# Altium PCB CW341_KintexUSTarget.PcbDoc (part 2 of 7)
Units mil, origin at the board's own origin, x right, y up, seen from the top; angles counter-clockwise.
Board outline 4566.97 x 5485 mil, 6 copper layers (Top Layer, Layer 2 (GND), Layer 3 (sig), Layer 4 (sig), Layer 5 (PWR), Bottom Layer), stack 61.068 mil thick; 157 components, 262 nets, 1869 pads, 1478 vias.
Unrouted connection lines stored in the file: 128.
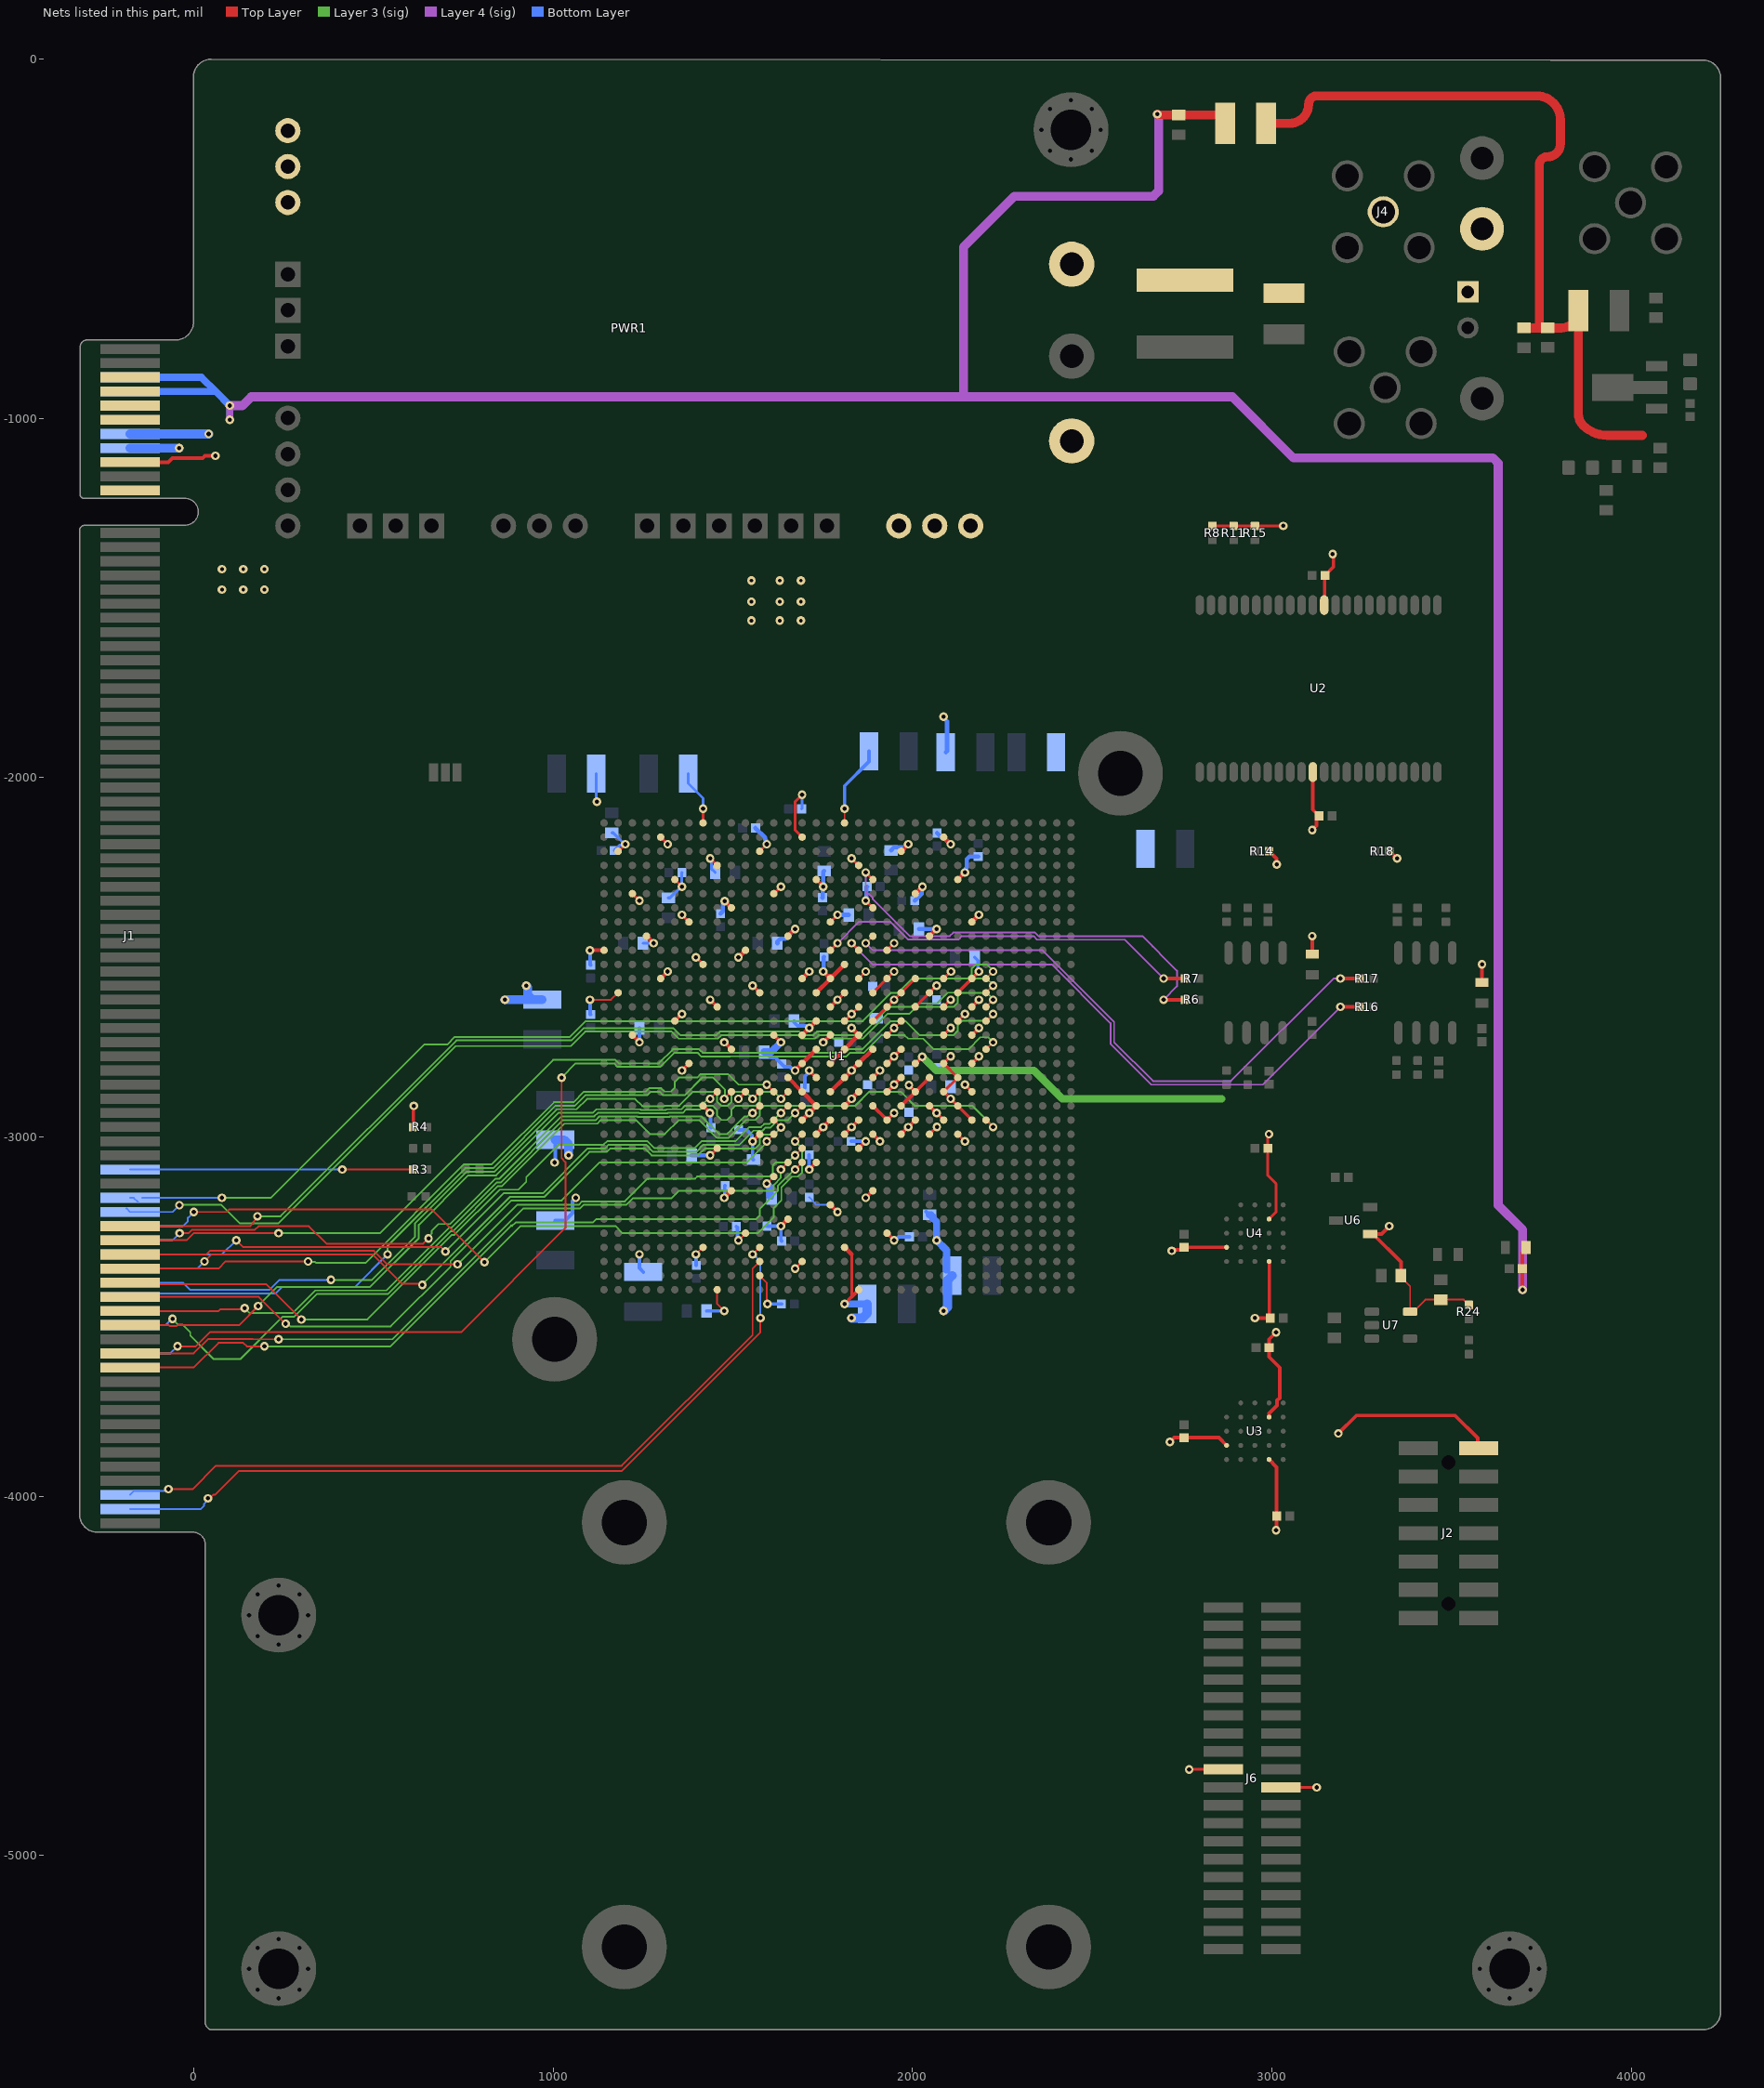
[diagram p6: the nets of this part, all layers, seen from the top]

## Part data
C1 C2 C3 C4 C7 C8 C9 C10 C11 C13 C18 C19 C24 C27 C28 C29 C30 C33 C35 C36 C39 C40 C41 C44 C45 C46 C48 C49 C50 C51 C52 C54 C56 C57 C59 C62 C63 C64 C67 C68 C69 C71 C73 C79 C81 C82 C89: library part CCHIP-100n-0402, "100n, 0402", Case-EIA=0402, Manufacture Part Number 1=CGA2B3X7R1V104K050BB, Supplier Part Number 1=445-6901-1-ND, Component Group=Capacitor, Component Type=Standard, Mounting Technology=SMT, Part Number=CCHIP-100n-0402, Pin Count=2, Supplier 1=Digi-Key
C5 C6 C15 C17: library part CCHIP-18p-0402, "18p, 0402", Case-EIA=0402, Manufacture Part Number 1=GRM1555C1H180JA01D, Supplier Part Number 1=490-5858-1-ND, Component Group=Capacitor, Component Type=Standard, Mounting Technology=SMT, Part Number=CCHIP-18p-0402, Pin Count=2, Supplier 1=Digi-Key
C12: library part CCHIP-1u-0603, "1u, 0603, 50V", Case-EIA=0603, Case-Metric=1608, Manufacture Part Number 1=CL10A105KB8NNNC, Rated Voltage=50VDC, Supplier Part Number 1=1276-1860-1-ND, Component Group=Capacitor, Component Type=Standard, Mounting Technology=SMT, Part Number=CCHIP-1u-0603, Pin Count=2, Supplier 1=Digi-Key
C14: library part CCHIP-2u2-0603-25V, "2u2, 0603", Case-EIA=0603, Case-Metric=1608, Manufacture 1="Murata Electronics North America", Manufacture Part Number 1=GRM188R61E225MA12D, Rated Voltage=25VDC, Supplier Part Number 1=490-12738-1-ND, Tolerance=±20%, Component Group=Capacitor, Component Type=Standard, Mounting Technology=SMT, Part Number=CCHIP-2u2-0603-25V, Pin Count=2, RoHS=Yes, Supplier 1=Digi-Key
C16: library part CCHIP-470n-0603-50V, "470n, 0603, 50V", Case-EIA=0603, Manufacture 1="Taiyo Yuden", Manufacture Part Number 1=UMK107B7474KA-TR, Rated Voltage=50VDC, Supplier Part Number 1=587-3170-1-ND, Temperature Range="-55C to 125C", Component Group=Capacitor, Component Type=Standard, Mounting Technology=SMT, Part Number=CCHIP-470n-0603-50V, Pin Count=2, RoHS=Yes, Supplier 1=Digi-Key
C20 C21 C22 C23 C32 C34 C72 C75 C80 C83 C84 C85: library part CCHIP-47u-1210, "47u, 10V, 1210, Ceramic", Case-EIA=1210, Case-Metric=3225, Manufacture 1="TDK Corporation", Manufacture Part Number 1=C3225X5R1A476M250AC, Rated Voltage=10VDC, Supplier Part Number 1=445-6711-1-ND, Temperature Range="-55C to 85C", Tolerance=20%, Component Group=Capacitor, Component Type=Standard, Mounting Technology=SMT, Part Number=CCHIP-47u-1210, Pin Count=2, Supplier 1=Digi-Key
C25 C26 C31 C37 C38 C42 C43 C47 C53 C55 C58 C60 C61 C65 C66 C70 C74 C76 C77 C78 C90 C91: library part CCHIP-2u2-0603, "2u2, 0603", Case-EIA=0603, Case-Metric=1608, Manufacture 1=Samsung, Manufacture Part Number 1=CL10B225KP8NNNC, Rated Voltage=10VDC, Supplier Part Number 1=1276-1134-1-ND, Component Group=Capacitor, Component Type=Standard, Mounting Technology=SMT, Part Number=CCHIP-2u2-0603, Pin Count=2, Supplier 1=Digi-Key
C86 C88: library part CCHIP-10u-0603, "10u, 0603", Case-EIA=0603, Case-Metric=1608, Manufacture Part Number 1=GRM188R61C106MA73D, Supplier Part Number 1=490-7201-1-ND, Component Group=Capacitor, Component Type=Standard, Mounting Technology=SMT, Part Number=CCHIP-10u-0603, Pin Count=2, Supplier 1=Digi-Key
C87: library part CCHIP-1n-0603, "1n, 0603", Case-EIA=0603, Case-Metric=1608, Manufacture 1=AVX, Manufacture Part Number 1=06033D102KAT2A, Rated Voltage=50VDC, Component Group=Capacitor, Component Type=Standard, Mounting Technology=SMT, Part Number=CCHIP-1n-0603, Pin Count=2, Supplier 1=Digi-Key
C94: library part CCHIP-DNM-0603, "DNM, 0603", Case-EIA=0603, Component Group=Capacitor, Component Type=Standard, Mounting Technology=SMT, Part Number=CCHIP-DNM-0603, Pin Count=2
FAN1: library part BFB03505HHA-A, Manufacture 1="Delta Fans", Component Group=Mechanical, Component Type=Standard, Manufacture Part Number 1=BFB03505HHA-A, Part Number=BFB03505HHA-A, PP Material Stack=0, PP Rotation=0, PP Rotation1=0
HS1: "Heatsink, 35mm square", Manufacture 1=ATS, Component Group=Mechanical, Component Type=Standard, Manufacture Part Number 1=ATS-FPX035035015-56-C2-R0, Part Number=ATS-FPX035035015-56-C2-R0, PP Material Stack=0, PP Rotation=0, PP Rotation1=0, Supplier 1=Digi-Key
J1: library part "PCIe x16 Connector Edge (gold finger, x8 mode)", "Edge Fingers No Part to Install", Package=PCIeX16-GF-2D-1000-1K-O164, MF=NA, MP=PCIE-164-02-X-D-RA, Price=NA
J2: "Molex 14-pin SMD, JTAG Pinout", Manufacture 1=Molex, Manufacture 1 Part Number=87832-1420, Supplier Part Number 1=WM18641-ND, Supplier 1=Digi-Key
J3 J4 J7: "SMA, Vert", Manufacture 1="TE Connectivity", Supplier Part Number 1=A97594-ND, Component Group=Connector, Component Type=Standard, Manufacture Part Number 1=5-1814832-1, Part Number=5-1814832-1, Pin Count=2, Supplier 1=Digi-Key
J5: "Header, 2-Pin", LatestRevisionDate=17-Jul-2002, LatestRevisionNote="Re-released for DXP Platform.", Publisher="Altium Limited"
J6: library part CONN_40POS_1.27MM_SHROUDED, Manufacture 1=Samtec, Manufacture Part Number 1=SHF-120-01-L-D-SM, Supplier Part Number 1=SAM9922-ND, Component Group=Connector, Component Type=Standard, Part Number=CONN_40POS_1.27MM_SHROUDED, Pin Count=40, PP Material Stack=0, PP Rotation=0, PP Rotation1=0, Supplier 1=Digi-Key
L1: library part XAL7070-122MEB, "1.2uH, 21A RMS", Manufacture 1=Coilcraft, Component Group=Inductor, Component Type=Standard, Manufacture Part Number 1=XAL7070-122MEB, Part Number=XAL7070-122MEB, Pin Count=2, PP Material Stack=0, PP Rotation=0, PP Rotation1=0, Supplier 1=Mouser
L2: library part FBCHIP-1K-1210, "Ferrite Bead, 1K@100MHz, 2A, 1210, 100mOhm DC, AEC-Q200", Case-EIA=1210, Case-Metric=3225, Manufacture 1="Taiyo Yuden", Supplier Part Number 1=587-3835-1-ND, Temperature Range="-40C to 125C", Component Group=Inductor, Component Type=Standard, Manufacture Part Number 1=FBMH3225HM102NTV, Mounting Technology=SMT, Part Number=FBCHIP-1K-1210, Pin Count=2, PP Material Stack=0, PP Rotation=0, RoHS=Yes, Supplier 1=Digi-Key
L3 L5: library part FBCHIP-120R-0603, "120 Ohm @ 100 MHz, 3A rated FB", Case-EIA=0603, Case-Metric=1680, Manufacture 1="Murata Electronics", Manufacture Part Number 1=BLM18SG121TN1D, Rated Power=3A, Supplier Part Number 1=490-3996-1-ND, Component Group=Inductor, Component Type=Standard, Part Number=FBCHIP-120R-0603, Pin Count=2, PP Material Stack=0, PP Rotation=0, Supplier 1=Digi-Key
L4 L6: library part FBCHIP-600R-0603, "600 Ohm @ 100 MHz, 0.5A rated FB", Case-EIA=0603, Case-Metric=1608, Manufacture 1="Murata Electronics", Manufacture Part Number 1=BLM18AG601SN1D, Rated Power=0.5A, Supplier Part Number 1=490-1014-2-ND, Component Group=Inductor, Component Type=Standard, Part Number=FBCHIP-600R-0603, Pin Count=2, PP Material Stack=0, PP Rotation=0, Supplier 1=Digi-Key
L7: library part FBCHIP-1K-1210, "Ferrite Bead, 1K@100MHz, 2A, 1210, 100mOhm DC, AEC-Q200", Case-EIA=1210, Case-Metric=3225, Manufacture 1="Taiyo Yuden", Manufacture Part Number 1=FBMH3225HM102NTV, Supplier Part Number 1=587-3835-1-ND, Temperature Range="-40C to 125C", Component Group=Inductor, Component Type=Standard, Mounting Technology=SMT, Part Number=FBCHIP-1K-1210, Pin Count=2, PP Material Stack=0, PP Rotation=0, RoHS=Yes, Supplier 1=Digi-Key
L8: "15uH, 300mA, 1210 Inductor", Case-EIA=1210, Case-Metric=3225, Manufacture 1="Murata Electronics", Supplier Part Number 1=490-9909-1-ND, Temperature Range="-40C to 125C", Component Group=Inductor, Component Type=Standard, Manufacture Part Number 1=LQH32DN150K53L, Mounting Technology=SMT, Part Number=LQH32DN150K53L, Pin Count=2, PP Material Stack=0, PP Rotation=0, RoHS=Yes, Supplier 1=Digi-Key
L9: library part LCHIP-5N1-0603, "FIXED IND 5.1nH", Case-EIA=0603, Case-Metric=1608, Manufacture 1=Coilcraft, Manufacture Part Number 1=0603CS-5N1XJLU, Supplier Part Number 1=994-0603CS-5N1XJLU, Tolerance=±5%, Component Group=Inductor, Component Type=Standard, Mounting Technology=SMT, Part Number=LCHIP-5N1-0603, Pin Count=2, PP Material Stack=0, PP Rotation=0, Supplier 1=Mouser
MH1 MH2 MH4 MH6: library part MOUNT_#4_TIGHT, "Machine screw 4-40 Mounting Hole", Component Group=Mechanical, Component Type=Mechanical, Part Number=MOUNT_#4_TIGHT, Pin Count=1, PP Material Stack=0, PP Rotation=0
R1 R5 R6 R7 R16 R17 R23: library part RCHIP-1K-0402, "1k res, 0402, 1%, 1/16W", Case-EIA=0402, Case-Metric=1005, Manufacture 1=Yageo, Manufacture Part Number 1=RC0402FR-071KL, Rated Power=0.063W, Rated Voltage=75VDC, Supplier Part Number 1=311-1.00KLRCT-ND, Temperature Range="-55C to 155C", Tolerance=1%, Component Group=Resistor, Component Type=Standard, Mounting Technology=SMT, Part Number=RCHIP-1K-0402, Pin Count=2, Supplier 1=Digi-Key
R2 R4: library part RCHIP-DNM-0402, Case-EIA=0402, Case-Metric=1005, Component Group=Resistor, Component Type=Standard, Part Number=RCHIP-DNM-0402, Pin Count=2
R3: library part RCHIP-1R0-0402, "1R0 res, 0402, 1%, 1/16W", Case-EIA=0402, Case-Metric=1005, Manufacture 1=Yageo, Manufacture Part Number 1=RC0402FR-071RL, Rated Power=0.063W, Rated Voltage=75VDC, Supplier Part Number 1=311-1.00LRCT-ND, Temperature Range="-55C to 155C", Tolerance=1%, Component Group=Resistor, Component Type=Standard, Mounting Technology=SMT, Part Number=RCHIP-1R0-0402, Pin Count=2, Supplier 1=Digi-Key
R8 R11 R14 R15 R18: library part RCHIP-10K-0402, "10k res, 0402, 1%, 1/16W", Case-EIA=0402, Case-Metric=1005, Manufacture 1=Yageo, Manufacture Part Number 1=RC0402FR-0710KL, Rated Power=0.063W, Rated Voltage=75VDC, Supplier Part Number 1=311-10.0KLRCT-ND, Temperature Range="-55C to 155C", Tolerance=1%, Component Group=Resistor, Component Type=Standard, Mounting Technology=SMT, Part Number=RCHIP-10K-0402, Pin Count=2, Supplier 1=Digi-Key
R9 R12 R20 R21: library part RCHIP-220K-0402, "220k res, 0402, 1%, 1/16W", Case-EIA=0402, Case-Metric=1005, Manufacture 1=Yageo, Manufacture Part Number 1=RC0402FR-07220KL, Rated Power=0.063W, Rated Voltage=75VDC, Supplier Part Number 1=311-220KLRCT-ND, Temperature Range="-55C to 155C", Tolerance=1%, Component Group=Resistor, Component Type=Standard, Mounting Technology=SMT, Part Number=RCHIP-220K-0402, Pin Count=2, Supplier 1=Digi-Key
R10 R13 R19 R22: library part RCHIP-680K-0402, "680k res, 0402, 1%, 1/16W", Case-EIA=0402, Case-Metric=1005, Manufacture 1=Yageo, Manufacture Part Number 1=RC0402FR-07680KL, Rated Power=0.063W, Rated Voltage=75VDC, Supplier Part Number 1=YAG3211CT-ND, Temperature Range="-55C to 155C", Tolerance=1%, Component Group=Resistor, Component Type=Standard, Mounting Technology=SMT, Part Number=RCHIP-680K-0402, Pin Count=2, Supplier 1=Digi-Key
R24: library part RCHIP-2K7-0402, "2k7 res, 0402, 1%, 1/16W", Case-EIA=0402, Case-Metric=1005, Manufacture 1=Yageo, Manufacture Part Number 1=RC0402FR-072K7L, Rated Power=0.063W, Rated Voltage=75VDC, Supplier Part Number 1=311-2.70KLRCT-ND, Temperature Range="-55C to 155C", Tolerance=1%, Component Group=Resistor, Component Type=Standard, Mounting Technology=SMT, Part Number=RCHIP-2K7-0402, Pin Count=2, Supplier 1=Digi-Key
R25: library part RCHIP-1K5-0603, "1k5 res, 0603, 1%, 1/10W", Case-EIA=0603, Case-Metric=1608, Manufacture 1=Yageo, Manufacture Part Number 1=RC0603FR-071K5L, Rated Power=0.1W, Rated Voltage=75VDC, Supplier Part Number 1=311-1.50KHRCT-ND, Temperature Range="-55C to 155C", Tolerance=1%, Component Group=Resistor, Component Type=Standard, Mounting Technology=SMT, Part Number=RCHIP-1K5-0603, Pin Count=2, Supplier 1=Digi-Key
R26: library part RCHIP-51R-0603, "51R res, 0603, 1%, 1/10W", Case-EIA=0603, Case-Metric=1608, Manufacture 1=Yageo, Manufacture Part Number 1=RC0603FR-0751RL, Rated Power=0.1W, Rated Voltage=75VDC, Supplier Part Number 1=311-51.0HRCT-ND, Temperature Range="-55C to 155C", Tolerance=1%, Component Group=Resistor, Component Type=Standard, Mounting Technology=SMT, Part Number=RCHIP-51R-0603, Pin Count=2, Supplier 1=Digi-Key
SJ1: library part SJ_3S_12JMP, "Solder Jumper, NC", Component Group="PCB Feature", Component Type="Standard (No BOM)", Mounting Technology=COPPER, Part Number=SJ_3S_12JMP, Pin Count=3
TP1 TP2 TP3: library part TESTPAD_9022-0-00-15-00-00-33-0, Manufacture 1="Mill-Max Manufacturing Corp.", Manufacture Part Number 1=9022-0-00-15-00-00-33-0, Supplier Part Number 1=ED90411-ND, Component Group="Test Point", Component Type=Standard, Mounting Technology=Through-hole, Part Number=TESTPAD_9022-0-00-15-00-00-33-0, Pin Count=1, Supplier 1=Digi-Key
TP4: library part KEYSTONE_5011, "TEST POINT PC MULTI PURPOSE BLK", Supplier Part Number 1=36-5011-ND, Component Group="Test Point", Component Type=Standard, Mounting Technology=Through-hole, Part Number=KEYSTONE_5011, Pin Count=1, Supplier 1=Digi-Key
TP5 TP6: library part KEYSTONE_5008, "TEST POINT PC COMPACT .063\"D ORG", Supplier Part Number 1=36-5008-ND, Component Group="Test Point", Component Type=Standard, Mounting Technology=Through-hole, Part Number=KEYSTONE_5008, Pin Count=1, Supplier 1=Digi-Key
U1: library part IC-XCKU095-1156, "IC FPGA 520 I/O 1156FCBGA", Manufacturer=Xilinx, Manufacturer Part Number=XCKU060-3FFVA1156E, Max Junction Temp=+100°C, Max Supply Voltage=1.8V, Min Supply Voltage=0.97V, Package=0, Temperature="0°C to +100°C", Temperature Range Low=0°C, Automotive=No, Category=IC, ComponentLink2Description=Datasheet, ComponentLink2URL=https://www.xilinx.com/support/documentation/data_sheets/ds890-ultrascale-overview.pdf, Device Class L1="Integrated Circuits (ICs)", Device Class L2="Embedded Processors and Controllers", Device Class L3="FPGAs - Field Programmable Gate Arrays", Digikey Description="IC FPGA 520 I/O 1156FCBGA", Footprint Url=https://www.xilinx.com/support/documentation/user_guides/ug575-ultrascale-pkg-pinout.pdf, Height=3.51mm, Ipc Land Pattern Name=BGA1156N100P34X34_3500X3500X342, Lead Free=Yes, Memory Type=RAM, Number of I/Os=520, Number Of Logic Elements Cells=1176000, Octopart=https://octopart.com/xcku035-3ffva1156e-xilinx-67038192?r=sp, Ram Size=38MBytes, RoHS=TRUE, Speed Grade=3, Standoff Height=0.4mm, Temperature Range High=+100°C
U2: library part IS62WV51216EALL-55TLI, "IC SRAM 8M PARALLEL 44TSOP II", Case/Package=TSOP, Manufacture 1="Alliance Memory", Max Operating Temperature=85°C, Max Supply Current=60mA, Max Supply Voltage=2.2V, Min Operating Temperature=-40°C, Min Supply Voltage=1.65V, Operating Supply Voltage=3V, Package Quantity=135, Supplier Part Number 1=1450-1039-ND, Access Time=55ns, Address Bus Width=20b, Category=RAM, Component Group="Digital IC", Component Type=Standard, ComponentLink3Description=https://datasheet.ciiva.com/9274/as6c8008-9274921.pdf?src-supplier=Avnet, ComponentLink3URL=https://datasheet.ciiva.com/9274/as6c8008-9274921.pdf?src-supplier=Avnet, ComponentLink4Description=https://datasheet.ciiva.com/1510/32786-1510631.pdf?src-supplier=Element14, ComponentLink4URL=https://datasheet.ciiva.com/1510/32786-1510631.pdf?src-supplier=Element14, Density=8Mb, Height=1mm, Interface=Parallel, Lead Free="Lead Free", Length=18.42mm, Manufacture Part Number 1=IS62WV51216EALL-55TLI, Manufacturer Part Number=IS62WV51216EALL-55TLI, Memory Size=8Mb, Memory Type="RAM,SRAM - Asynchronous,SDR", Mount="Surface Mount", Mounting Technology=SMT, Number of Pins=44, Number of Ports=1, Packaging=Tray, Part Number=IS62WV51216EALL-55TLI, Pin Count=44, PP Material Stack=0, PP Rotation=0, Pricing 1="1=6.76000, 10=6.21600, 25=6.08640, 50=6.06560, 135=5.44252, 270=5.27800, 540=5.01900, 1080=4.84400, 5130=4.35750 (USD)", Radiation Hardening=No, REACH SVHC="No SVHC", RoHS=Yes, Stock 1=1798, Supplier 1=Digi-Key, Width=10.16mm
U3 U4: library part S80KS5122GABHM020, "IC PSRAM 512MBIT HYPERBUS 24FBGA", Case/Package=24-VBGA, Manufacture 1="Infineon Technologies", Max Operating Temperature=125°C, Max Supply Current=44mA, Max Supply Voltage=2.5V, Min Operating Temperature=-40°C, Min Supply Voltage=0V, Operating Supply Voltage=1.7V~2V, Package Quantity=0, Supplier Part Number 1=1450-1039-ND, Access Time=35ns, Address Bus Width=8b, Category=RAM, Component Group="Digital IC", Component Type=Standard, ComponentLink3Description=https://datasheet.ciiva.com/9274/as6c8008-9274921.pdf?src-supplier=Avnet, ComponentLink3URL=https://www.infineon.com/dgdl/Infineon-S80KS5122_1.8_V_512-Mbit_HyperBus_Interface_HyperRAM_(Self-Refresh_DRAM)-DataSheet-v01_00-EN.pdf?fileId=8ac78c8c7dc4255f017dd81b77c1088f, ComponentLink4Description=https://datasheet.ciiva.com/1510/32786-1510631.pdf?src-supplier=Element14, ComponentLink4URL=https://www.infineon.com/dgdl/Infineon-S80KS5122_1.8_V_512-Mbit_HyperBus_Interface_HyperRAM_(Self-Refresh_DRAM)-DataSheet-v01_00-EN.pdf?fileId=8ac78c8c7dc4255f017dd81b77c1088f, Density=512Mbit, Height=1mm, Interface=HyperBus, Lead Free="Lead Free", Length=8mm, Manufacture Part Number 1=S80KS5122GABHM020, Manufacturer Part Number=S80KS5122GABHM020, Memory Size=512Mb, Memory Type="RAM,SRAM - Asynchronous,SDR", Mount="Surface Mount", Mounting Technology=SMT, Number of Pins=24, Number of Ports=1, Packaging=Tray, Part Number=S80KS5122GABHM020, Pin Count=24, PP Material Stack=0, PP Rotation=0, Pricing 1="1=6.76000, 10=6.21600, 25=6.08640, 50=6.06560, 135=5.44252, 270=5.27800, 540=5.01900, 1080=4.84400, 5130=4.35750 (USD)", Radiation Hardening=No, REACH SVHC="No SVHC", RoHS=Yes, Stock 1=1798, Supplier 1=Digi-Key, Width=6mm
U5 U8: library part LM2904_SOIC8, "IC OP-AMP GP", Manufacture 1="Texas Instruments", Supplier Part Number 1=296-48991-1-ND, Component Group="Analog IC", Component Type=Standard, Manufacture Part Number 1=TLV8542DR, Mounting Technology=SMT, Part Number=LM2904_SOIC8, Pin Count=8, PP Material Stack=0, PP Rotation=0, RoHS=Yes, Supplier 1=Digi-Key
U6: "IC VREF SERIES 0.2% SOT23-3", Case/Package=SOT-23, Manufacture 1="Texas Instruments", Max Input Voltage=5.5V, Max Operating Temperature=125°C, Max Output Current=25mA, Max Output Voltage=1.25V, Max Supply Current=50uA, Min Input Voltage=1.8V, Min Operating Temperature=-40°C, Min Output Voltage=1.248V, Nominal Supply Current=42uA, Package Quantity=1, Supplier Part Number 1=REF3012AIDBZTTR-ND, Temperature Coefficient=50ppm/°C, Category="Voltage References", Component Group="Analog IC", Component Type=Standard, ComponentLink3Description=https://datasheet.ciiva.com/2007/ref3012-2007154.pdf?src-supplier=Digi-Key, ComponentLink3URL=https://datasheet.ciiva.com/2007/ref3012-2007154.pdf?src-supplier=Digi-Key, ComponentLink4Description=https://datasheet.ciiva.com/2007/ref3012-2007155.pdf?src-supplier=Digi-Key, ComponentLink4URL=https://datasheet.ciiva.com/2007/ref3012-2007155.pdf?src-supplier=Digi-Key, ComponentLink5Description=https://datasheet.ciiva.com/3235/ref3033-3235533.pdf?src-supplier=Avnet, ComponentLink5URL=https://datasheet.ciiva.com/3235/ref3033-3235533.pdf?src-supplier=Avnet, ComponentLink6Description=https://datasheet.ciiva.com/3235/ref3033-3235534.pdf?src-supplier=Avnet, ComponentLink6URL=https://datasheet.ciiva.com/3235/ref3033-3235534.pdf?src-supplier=Avnet, Height=1mm, Lead Free="Lead Free", Length=2.92mm, Manufacture Part Number 1=REF3012AIDBZT, Manufacturer Part Number=REF3012AIDBZT, Mounting Technology=SMT, Number of Channels=1, Number of Pins=3, Output Current=25mA, Output Voltage=1.25V, Packaging="Tape and Reel", Part Number=REF3012AIDBZT, Pin Count=3, PP Material Stack=0, PP Rotation=0, Pricing 1="1=1.18000, 10=1.05300, 25=0.99960, 100=0.76760 (USD)", Quiescent Current=50uA, Radiation Hardening=No, REACH SVHC="No SVHC", Reference Type=Series,Fixed, Reference Voltage=1.25V, RoHS=Yes, Stock 1=7831, Supplier 1=Digi-Key, Termination=SMD/SMT, Width=1.3mm
U7: library part ADP123AUJZ-R7, "IC REG LIN POS ADJ 300MA TSOT5", Case/Package=TSOT, Dropout Voltage=85mV, Manufacture 1="Analog Devices Inc.", Max Input Voltage=5.5V, Max Operating Temperature=125°C, Max Output Current=300mA, Max Output Voltage=5V, Max Supply Current=170uA, Min Current Limit=350mA, Min Input Voltage=2.3V, Min Operating Temperature=-40°C, Min Output Voltage=800mV, Nominal Supply Current=45uA, Output Voltage Accuracy=1%, Power Supply Rejection Ratio (PSRR)=60dB, Reference Voltage=500mV, Supplier Part Number 1=ADP123AUJZ-R7TR-ND, Accuracy=1%, Category="Voltage Regulators - Linear", Component Group="Analog IC", Component Type=Standard, ComponentLink3Description=https://datasheet.ciiva.com/2040/adp122-123-2040698.pdf?src-supplier=Digi-Key, ComponentLink3URL=https://datasheet.ciiva.com/2040/adp122-123-2040698.pdf?src-supplier=Digi-Key, ComponentLink4Description=https://datasheet.ciiva.com/2040/adp122-123-2040699.pdf?src-supplier=Digi-Key, ComponentLink4URL=https://datasheet.ciiva.com/2040/adp122-123-2040699.pdf?src-supplier=Digi-Key, Contact Plating=Tin,Matte, Height=0.9mm, Lead Free="Contains Lead", Length=2.9mm, Manufacture Part Number 1=ADP123AUJZ-R7, Manufacturer Part Number=ADP123AUJZ-R7, Mounting Technology=SMT, Number Of Outputs=1, Number of Pins=5, Number of Regulators=1, Operating Supply Current=45uA, Output Current=300mA, Output Type=Adjustable, Output Voltage=5V, Packaging="Tape and Reel", Part Number=ADP123AUJZ-R7, Pin Count=5, Polarity=Positive, PP Material Stack=0, PP Rotation=0, Pricing 1="1=1.16000, 10=1.03300, 25=0.98000, 100=0.75250, 250=0.66500, 500=0.63000, 1000=0.49000 (USD)", Quiescent Current=45uA, REACH SVHC="No SVHC", Stock 1=14167, Supplier 1=Digi-Key, Width=1.6mm
U9: "Integrated Circuit", Manufacturer_Name=Mini-Circuits, Mouser Part Number=139-PHA-13LN, Datasheet Link=https://www.minicircuits.com/pdfs/PHA-13LN+.pdf, Height=1.6mm, Manufacturer_Part_Number=PHA-13LN+, Mouser Price/Stock=https://www.mouser.co.uk/ProductDetail/Mini-Circuits/PHA-13LN%2b?qs=xZ%2FP%252Ba9zWqYkwnUBoTp7PQ%3D%3D

## Via types
v1: diameter 24, hole 12, Top Layer to Bottom Layer, tented both sides, 1463 vias
v2: diameter 24, hole 10, Top Layer to Bottom Layer, tented both sides, 15 vias

## Nets (pads, with @x,y where several pads share a name; then routed paths per layer and width w, separated by ;. In a path a pad name is that pad's centre, name@x,y a point inside that pad or via, vN(x,y) a via of type N, cw(c..) or ccw(c..) an arc to the next point about the centre after c; other vN are vias at no path point)
1V2: J1.B9 | length 245
  Top Layer w10: J1.B9@-177.17,-1122.05 -70.71,-1122.05 -58.92,-1110.26 25.31,-1110.26 31.54,-1104.02 v1(60.35,-1104.02)
+1V0_VCCINT: C20.1 C21.1 C26.1 C29.1 C35.1 C36.1 C39.1 C40.1 C42.1 C44.1 TP1.1 U1.AA10 U1.AA12 U1.AA14 U1.AA16 U1.AA18 U1.AB11 U1.AB13 U1.AB15 U1.AB17 U1.AC10 U1.AC12 U1.AC14 U1.AC16 U1.M9 U1.M11 U1.M13 U1.M15 U1.M17 U1.N8 U1.N10 U1.N12 U1.N14 U1.N16 U1.P9 U1.P11 U1.P13 U1.P15 U1.P17 U1.R8 U1.R10 U1.R12 U1.R14 U1.R16 U1.R18 U1.T9 U1.T11 U1.T13 U1.T15 U1.T17 U1.U10 U1.U14 U1.U16 U1.U18 U1.V13 U1.V15 U1.V17 U1.W10 U1.W14 U1.W16 U1.W18 U1.Y13 U1.Y15 U1.Y17 | length 1893.8
  Top Layer w5: v1(1948.82,-2696.85) U1.Y13@1968.5,-2677.17
  Top Layer w8: U1.Y17@1811.02,-2677.17 U1.AA16@1850.39,-2637.8 ; U1.AC16@1850.39,-2559.06 v1(1870.08,-2539.37) ; U1.Y15@1889.76,-2677.17 U1.AC12@2007.87,-2559.06 ; U1.AB15@1889.76,-2598.43 U1.AC14@1929.13,-2559.06 v1(1948.82,-2539.37) ; U1.W14@1929.13,-2716.54 v1(1948.82,-2696.85) ; U1.AA12@2007.87,-2637.8 U1.AB11@2047.24,-2598.43 v1(2066.93,-2578.74) ; U1.M11@2047.24,-2992.13 2049.33,-2992.13 2049.33,-2990.36 v1(2068.01,-2971.67) ; U1.W10@2086.61,-2716.54 v1(2106.3,-2696.85) ; U1.AA10@2086.61,-2637.8 v1(2106.3,-2618.11) ; U1.AC10@2086.61,-2559.06 2086.9,-2559.06 2106.59,-2539.37 v1(2106.88,-2539.37) ; v1(2106.3,-2775.59) U1.U10@2086.61,-2795.28 U1.T9@2125.98,-2834.65 U1.R10@2086.61,-2874.02 U1.N8@2165.35,-2952.76 ; U1.M9@2125.98,-2992.13 v1(2145.67,-3011.81) ; v1(2145.67,-2854.33) U1.R8@2165.35,-2874.02
  Top Layer w10: v1(1751.97,-2736.22) U1.W18@1771.65,-2716.54 ; U1.AA18@1771.65,-2637.8 U1.AB17@1811.02,-2598.43 ; U1.M17@1811.02,-2992.13 U1.N16@1850.39,-2952.76 ; U1.M15@1889.76,-2992.13 v1(1909.45,-3011.81) ; U1.P15@1889.76,-2913.39 U1.N14@1929.13,-2952.76 v1(1948.82,-2933.07) ; U1.T15@1889.76,-2834.65 v1(1909.45,-2814.96) ; U1.R14@1929.13,-2874.02 U1.T13@1968.5,-2834.65 ; U1.U14@1929.13,-2795.28 v1(1948.82,-2775.59) U1.V13@1968.5,-2755.91 ; U1.M13@1968.5,-2992.13 U1.N12@2007.87,-2952.76 ; U1.P13@1968.5,-2913.39 U1.R12@2007.87,-2874.02 ; v1(1990.28,-2855.69) 1990.28,-2856.42 U1.R12@2007.87,-2874.02 ; U1.P11@2047.24,-2913.39 v1(2066.93,-2933.07) U1.N10@2086.61,-2952.76 ; U1.T11@2047.24,-2834.65 2027.56,-2854.33 U1.R12@2007.87,-2874.02
  Top Layer w12: U1.R18@1771.65,-2874.02 U1.T17@1811.02,-2834.65 U1.U16@1850.39,-2795.28 U1.V15@1889.76,-2755.91 ; U1.U18@1771.65,-2795.28 U1.V17@1811.02,-2755.91 U1.W16@1850.39,-2716.54 v1(1830.71,-2696.85) ; U1.P17@1811.02,-2913.39 U1.R16@1850.39,-2874.02
  other v1: 1830.71,-2972.44 1988.19,-2972.44 1830.71,-2893.7 2106.3,-2893.7 1948.82,-2854.33 1830.71,-2814.96 1830.71,-2657.48 1791.34,-2618.11 1948.82,-2618.11
+1V0_VCCINT_SHUNTLOW: J4.1 J5.1 L1.2 L2.2 PWR1.23 PWR1.24 PWR1.25 TP3.1 TP6.1
+1V8: C1.1 C2.1 C3.1 C4.1 C7.1 C8.1 C9.1 C11.1 C22.1 C25.1 C30.1 C32.1 C34.1 C37.1 C41.1 C43.1 C45.1 C46.1 C47.1 C48.1 C49.1 C50.1 C51.1 C52.1 C53.1 C54.1 C55.1 C56.1 C57.1 C58.1 C59.1 C60.1 C61.1 C62.1 C63.1 C64.1 C65.1 C66.1 C67.1 C68.1 C69.1 C70.1 C71.1 C72.1 C73.1 C74.1 C75.1 C76.1 C77.1 C78.1 C79.1 C80.1 C81.1 C82.1 C83.1 C84.1 C85.1 J1.A7 J1.A8 J2.2 J6.19 J6.22 R4.1 R8.1 R11.1 R14.1 R15.1 R18.1 U1.A16 U1.A26 U1.AA8 U1.AA26 U1.AB9 U1.AB19 U1.AB23 U1.AB33 U1.AC8 U1.AC18 U1.AC20 U1.AC30 U1.AD17 U1.AD27 U1.AE14 U1.AE24 U1.AE34 U1.AF21 U1.AF31 U1.AG18 U1.AG28 U1.AH15 U1.AH25 U1.AJ22 U1.AJ32 U1.AK19 U1.AK29 U1.AL16 U1.AL26 U1.AM23 U1.AM33 U1.AN20 U1.AN30 U1.AP17 U1.AP27 U1.B23 U1.C20 U1.D17 U1.D27 U1.E14 U1.E24 U1.F21 U1.G18 U1.H15 U1.H25 U1.J22 U1.K19 U1.L16 U1.L26 U1.M19 U1.M23 U1.N18 U1.N20 U1.P19 U1.P27 U1.R20 U1.R24 U1.T19 U1.T21 U1.U8 U1.U20 U1.U28 U1.V19 U1.V25 U1.W8 U1.W20 U1.W22 U1.W32 U1.Y9 U1.Y19 U1.Y29 U2.11 U2.33 U3.B4 U3.D1 U3.E4 U4.B4 U4.D1 U4.E4 | length 8697.8
  Top Layer w5: v1(1102.36,-2618.11) 1161.28,-2618.11 1180.97,-2598.43 U1.AB33@1181.1,-2598.43 ; v1(1397.64,-3326.77) U1.D27@1417.32,-3307.09 ; U1.A26@1456.69,-3425.2 1456.69,-3464.57 v1(1476.38,-3484.25) ; v1(1515.75,-3287.4) U1.E24@1535.43,-3267.72 ; U1.B23@1574.8,-3385.83 1594.49,-3405.51 1594.49,-3462.66 v1(1596.39,-3464.57) ; v1(1594.49,-3129.92) U1.J22@1614.17,-3110.24 ; U1.AP17@1811.02,-2125.98 v1(1811.02,-2086.61)
  Top Layer w8: U1.AM33@1181.1,-2204.72 v1(1200.79,-2185.04) ; U1.AJ32@1220.47,-2322.83 v1(1240.16,-2342.52) ; U1.AN30@1299.21,-2165.35 v1(1318.9,-2185.04) ; U1.AK29@1338.58,-2283.46 v1(1358.27,-2303.15) ; v1(1358.27,-2381.89) U1.AG28@1377.95,-2401.57 ; v1(1397.64,-2500) U1.AD27@1417.32,-2519.69 ; U1.AP27@1417.32,-2125.98 1417.32,-2106.3 v1(1417.32,-2086.61) ; v1(1437.01,-2224.41) U1.AL26@1456.69,-2244.09 ; v1(1515.75,-2893.7) U1.R24@1535.43,-2874.02 ; U1.AM23@1574.8,-2204.72 v1(1594.49,-2185.04) ; U1.AJ22@1614.17,-2322.83 v1(1633.86,-2303.15) ; v1(1673.23,-3366.14) U1.C20@1692.91,-3346.46 ; U1.AN20@1692.91,-2165.35 1673.23,-2145.67 1673.23,-2066.93 v1(1692.91,-2047.24) ; U1.AG18@1771.65,-2401.57 v1(1791.34,-2381.89) ; 1830.58,-3445.01 1830.71,-3444.88 1830.71,-3326.77 ; v1(1830.71,-2224.41) U1.AL16@1850.39,-2244.09 ; v1(1870.08,-2342.52) U1.AH15@1889.76,-2362.2 ; U1.AE14@1929.13,-2480.32 v1(1948.82,-2460.63) ; U1.Y9@2125.98,-2677.17 v1(2145.67,-2657.48) ; v1(2770,-4760) J6.19@2865,-4760 ; R8.1@2834.65,-1299.21 v1(3031.5,-1299.21) ; U4.B4@2992.13,-3228.35 3011.81,-3208.66 3011.81,-3129.92 2988.98,-3107.09 C3.1@2988.98,-3031.5 2988.98,-2995.28 v1(2992.13,-2992.13) ; J6.22@3025,-4810 v1(3125,-4810)
  Top Layer w10: R4.1@610.24,-2972.44 612.32,-2970.35 611.28,-2969.31 611.28,-2914.43 v1(612.32,-2913.39) ; v1(1102.36,-2480.32) U1.AE34@1141.73,-2480.32 ; U1.W32@1220.47,-2716.54 v1(1240.16,-2736.22) ; U1.AC30@1299.21,-2559.06 v1(1318.9,-2539.37) ; U1.Y29@1338.58,-2677.17 v1(1358.27,-2657.48) ; v1(1358.27,-2814.96) U1.U28@1377.95,-2795.28 ; U1.P27@1417.32,-2913.39 1417.32,-2913.68 1436.43,-2932.78 v1(1436.43,-2933.07) ; v1(1437.01,-3051.23) U1.L26@1456.69,-3031.5 ; v1(1437.01,-2618.11) U1.AA26@1456.69,-2637.8 ; v1(1476.38,-2736.22) U1.V25@1496.06,-2755.91 ; v1(1555.12,-3011.81) U1.M23@1574.8,-2992.13 ; v1(1555.12,-2578.74) U1.AB23@1574.8,-2598.43 ; U1.W22@1614.17,-2716.54 v1(1633.86,-2736.22) ; U1.T21@1653.54,-2834.65 U1.R20@1692.91,-2874.02 ; v1(1712.6,-3090.55) U1.K19@1732.28,-3070.87 ; v1(1712.6,-2814.96) U1.T19@1732.28,-2834.65 ; U1.AK19@1732.28,-2283.46 v1(1751.97,-2303.15) ; U1.G18@1771.65,-3188.98 v1(1791.34,-3208.66) ; v1(1811.02,-3464.57) 1830.58,-3445.01 ; 1830.71,-3444.88 U1.A16@1850.39,-3425.2 ; U1.L16@1850.39,-3031.5 1852.26,-3033.36 1852.26,-3029.63 v1(1870.08,-3011.81) ; v1(1870.08,-3169.29) U1.H15@1889.76,-3149.61 ; U1.E14@1929.13,-3267.72 v1(1948.82,-3287.4) ; U1.AB9@2125.98,-2598.43 U1.AC8@2165.35,-2559.06 v1(2185.04,-2539.37) ; U1.U8@2165.35,-2795.28 v1(2185.04,-2775.59) ; U1.W8@2165.35,-2716.54 v1(2185.04,-2696.85) ; U1.AA8@2165.35,-2637.8 v1(2185.04,-2618.11) ; v1(2716.53,-3849.02) 2716.74,-3849.02 2728.86,-3836.9 2852.65,-3836.9 U3.D1@2874.02,-3858.27 ; v1(2721.45,-3316.81) 2724.13,-3314.13 2748.86,-3314.13 C2.1@2755.91,-3307.09 U4.D1@2874.02,-3307.09 ; v1(2952.76,-3503.94) C7.1@2995.28,-3503.94 2992.85,-3501.51 2992.85,-3347.18 U4.E4@2992.13,-3346.46 ; U3.E4@2992.13,-3897.64 3013.39,-3918.9 3013.39,-4092.91 v1(3011.81,-4094.49) ; U3.B4@2992.13,-3779.53 2992.68,-3778.97 2992.68,-3769.13 3014.61,-3747.2 3014.61,-3733.16 3021.65,-3726.11 3021.65,-3641.73 2992.13,-3612.2 2992.13,-3562.99 v1(3011.81,-3543.31) ; R14.1@2992.13,-2204.72 3012.82,-2225.42 3012.82,-2240.7 v1(3013.9,-2241.78) ; v1(3112.32,-2145.67) 3124.1,-2133.9 3124.1,-2113.7 C11.1@3131.5,-2106.3 3114.17,-2088.98 U2.11@3114.17,-1984.25 ; U2.33@3145.67,-1519.69 3146.85,-1518.5 3146.85,-1438.19 C9.1@3148.03,-1437.01 3171.38,-1413.66 3171.38,-1380.04 v1(3169.29,-1377.95) ; v1(3185,-3825) 3235,-3775 3510,-3775 3572.63,-3837.63 3572.63,-3863.8 J2.2@3575.28,-3866.45 ; R18.1@3326.77,-2204.72 3346.46,-2224.41 v1(3348.54,-2224.41)
  Top Layer w12: U1.AF31@1259.84,-2440.94 v1(1279.53,-2460.63) ; v1(1476.38,-3169.29) U1.H25@1496.06,-3149.61 ; v1(1477.78,-2343.29) 1477.78,-2343.6 1496.06,-2361.89 U1.AH25@1496.06,-2362.2 ; v1(1515.75,-2500) U1.AE24@1535.43,-2480.32 ; v1(1633.86,-3248.03) U1.F21@1653.54,-3228.35 ; U1.AF21@1653.54,-2440.94 v1(1673.23,-2421.26) ; v1(1673.23,-2814.96) U1.U20@1692.91,-2795.28 U1.V19@1732.28,-2755.91 ; U1.N20@1692.91,-2952.76 v1(1712.6,-2933.07) U1.P19@1732.28,-2913.39 U1.R20@1692.91,-2874.02 ; U1.W20@1692.91,-2716.54 v1(1712.6,-2696.85) U1.Y19@1732.28,-2677.17 ; U1.AC20@1692.91,-2559.06 v1(1712.6,-2539.37) ; U1.M19@1732.28,-2992.13 v1(1751.97,-2972.44) U1.N18@1771.65,-2952.76 ; U1.AB19@1732.28,-2598.43 U1.AC18@1771.65,-2559.06 v1(1751.97,-2539.37) ; 1764.28,-2551.68 1779.03,-2551.68 U1.AD17@1811.02,-2519.69 ; U1.D17@1811.02,-3307.09 1830.71,-3326.77
  Bottom Layer w5: C46.1@1712.6,-3167.72 1728.75,-3183.87 1728.75,-3185.44 1732.47,-3189.16 1771.84,-3189.16 v1(1791.34,-3208.66)
  Bottom Layer w8: C80.1@1120.2,-1988.19 1120.2,-2065.08 v1(1122.05,-2066.93) ; C78.1@1163.51,-2153.54 1167.44,-2153.54 1198.94,-2185.04 v1(1200.79,-2185.04) 1197.73,-2188.1 1184.96,-2188.1 C79.1@1170.12,-2202.94 ; C77.1@1250.12,-2460.63 v1(1279.53,-2460.63) ; C74.1@1320.99,-2334.65 1324.92,-2334.65 1356.42,-2303.15 v1(1358.27,-2303.15) 1358.27,-2264.29 C73.1@1358.78,-2263.78 ; C72.1@1376.1,-1988.19 1376.1,-2015.75 1417.32,-2056.97 v1(1417.32,-2086.61) ; v1(1437.01,-2224.41) 1437.01,-2228.74 1440.14,-2231.87 1440.14,-2253.02 C65.1@1450.91,-2263.78 ; C52.1@1691.34,-2086.61 1692.91,-2085.04 v1(1692.91,-2047.24)
  Bottom Layer w10: v1(1003.94,-3070.87) 1006.03,-3068.78 C84.1@1006.03,-3007.87 ; C83.1@1006.03,-3232.28 1033.58,-3232.28 1054.17,-3211.69 1054.17,-3178.11 v1(1062.99,-3169.29) ; v1(1102.36,-2618.11) 1103.41,-2619.15 1103.41,-2658.01 C81.1@1104.45,-2659.05 ; v1(1102.36,-2480.32) 1103.41,-2481.36 1103.41,-2520.22 C82.1@1104.45,-2521.26 ; v1(1240.16,-3326.77) 1240.16,-3364.8 C75.1@1251.05,-3375.7 ; v1(1240.16,-2736.22) C76.1@1240.16,-2696.72 ; C66.1@1385.83,-3051.18 C66.1@1385.87,-3051.23 ; v1(1397.64,-3326.77) 1398.12,-3327.26 1398.12,-3356.81 C71.1@1398.61,-3357.3 ; C70.1@1427.28,-3484.25 v1(1476.38,-3484.25) ; v1(1436.43,-2933.07) 1437.76,-2934.4 1437.76,-2972.68 C69.1@1439.1,-2974.02 ; v1(1476.38,-3169.29) 1477.42,-3168.25 1477.42,-3136.28 C67.1@1478.47,-3135.24 ; C64.1@1509.92,-3249.11 1513.07,-3252.26 1513.07,-3284.72 v1(1515.75,-3287.4) v1@1516,-3287.14 ; C63.1@1516.32,-2979.67 1517.17,-2980.52 1538.58,-2980.52 1553.4,-2995.34 1553.4,-3010.1 v1(1555.12,-3011.81) 1555.12,-3060.9 C61.1@1557.21,-3062.99 ; v1(1594.49,-3129.92) 1594.49,-3131 1594.49,-3133.71 v1@1598.62,-3137.85 ; C59.1@1595,-3248.03 v1(1633.86,-3248.03) 1633.86,-3287.4 C56.1@1636.1,-3289.65 ; v1(1596.39,-3464.57) C54.1@1635.43,-3464.57 ; C60.1@1596.49,-2768.47 1606.26,-2778.23 1617.33,-2778.23 C57.1@1635.95,-2796.85 1643.54,-2804.45 1658.93,-2804.45 1669.44,-2814.96 v1(1673.23,-2814.96) ; C55.1@1598.62,-3159.53 1603.62,-3164.53 C55.1@1608.39,-3169.29 ; C53.1@1670.67,-2677.09 1670.67,-2681.03 1680.43,-2690.79 1702.75,-2690.79 1708.81,-2696.85 v1(1712.6,-2696.85) ; C51.1@1700.38,-2863.19 1700.38,-2830.96 1712.6,-2818.75 v1(1712.6,-2814.96) ; v1(1712.6,-3090.55) C50.1@1712.6,-3049.61 ; v1@1791.34,-3212.45 v1(1791.34,-3208.66) ; v1(1811.02,-2086.61) 1811.02,-2022.88 1879.34,-1954.56 C32.1@1879.34,-1927 ; C45.1@1829.13,-3011.81 v1(1870.08,-3011.81) ; v1(1948.82,-3287.4) 1952.61,-3287.4 1962.05,-3277.96 C30.1@1991.74,-3277.96 ; C37.1@2038.32,-3207.61 C37.1@2047.24,-3216.54 ; C22.1@2089.94,-3365.24 2094.94,-3370.24 C22.1@2110.53,-3385.83 ; C25.1@2173.23,-2500 2182.36,-2509.13 2182.36,-2536.69 v1(2185.04,-2539.37)
  Bottom Layer w12: C66.1@1385.87,-3051.23 v1(1437.01,-3051.23) ; C68.1@1465.92,-2378.6 1472.52,-2372 1472.52,-2351.79 1477.78,-2346.53 v1(1477.78,-2343.29) ; C62.1@1563.2,-2140.03 1589.99,-2166.82 1589.99,-2172.37 1592.19,-2174.57 1592.19,-2182.74 v1(1594.49,-2185.04) ; C58.1@1624.14,-2460.63 1624.14,-2456.69 1632.9,-2447.93 1646.56,-2447.93 v1(1673.23,-2421.26) ; C49.1@1749.55,-2333.88 1750.76,-2332.67 1750.76,-2304.36 v1(1751.97,-2303.15) 1751.97,-2261.93 C47.1@1754.06,-2259.84 ; v1(1751.97,-2539.37) 1753.01,-2538.33 1753.01,-2499.47 C48.1@1754.06,-2498.42 ; v1(1791.34,-2381.89) C43.1@1822.83,-2381.89 ; v1(1870.08,-2342.52) 1871.91,-2340.69 1871.91,-2304.98 C41.1@1873.74,-2303.15
  Bottom Layer w20: C60.1@1587.08,-2763.79 1587.59,-2763.28 1606.8,-2763.28 v1(1633.86,-2736.22) ; v1@1594.49,-3131 1603.62,-3140.14 C55.1@1603.62,-3164.53 ; v1(1811.02,-3464.57) C34.1@1874.02,-3464.57 ; C37.1@2047.24,-3216.54 2051.18,-3216.54 2055.94,-3221.3 2055.94,-3225.24 2066.93,-3236.22 v1(2066.93,-3287.4) 2094.94,-3315.41 C22.1@2094.94,-3370.24
  Bottom Layer w25: J1.A8@-177.17,-1082.68 v1(-40.82,-1082.68) ; J1.A7@-177.17,-1043.31 v1(41.46,-1043.31) ; v1(866.14,-2618.11) 969.07,-2618.11 C85.1@969.51,-2617.68 941.95,-2617.68 928.86,-2604.59 928.86,-2582.4 v1(925.2,-2578.74) ; C84.1@1006.03,-3007.87 1030.22,-3007.87 1043.31,-3020.96 v1(1043.31,-3051.18) ; v1(1830.71,-3503.94) 1860.93,-3503.94 1874.02,-3490.85 C34.1@1874.02,-3464.57 ; v1(2086.61,-3484.25) 2097.44,-3473.43 2097.44,-3398.92 C22.1@2110.53,-3385.83
+1V85_XADC_VCC: C14.1 C16.1 C28.1 L3.2 L5.2 R24.1 U1.U12 U6.1 U7.5 | length 1572.6
  Top Layer w5: C14.1@3359.19,-3385.84 3359.19,-3389.77 3384.79,-3415.37 U7.5@3384.79,-3486.23 3393.64,-3486.23 3427.12,-3452.76 C16.1@3470.2,-3452.76 3533.64,-3452.76 R24.1@3548.17,-3467.28
  Top Layer w10: U1.U12@2007.87,-2795.28 2008.17,-2795.28 2026.53,-2776.91 v1(2026.83,-2776.91) ; L3.2@3112.2,-2490.94 3112.2,-2441.06 v1(3112.32,-2440.94) ; U6.1@3273.35,-3269.8 U6.1@3281.22,-3269.8 ; v1(3326.77,-3248.03) 3305,-3269.8 U6.1@3281.22,-3269.8 ; C14.1@3359.19,-3385.84 3359.19,-3347.78 U6.1@3281.22,-3269.8 ; L5.2@3584.65,-2569.69 3584.65,-2519.8 v1(3584.77,-2519.68)
  Layer 3 (sig) w20: v1(2026.83,-2776.91) 2027.69,-2776.91 2065.74,-2814.96 2338.06,-2814.96 2416.8,-2893.7 2860.49,-2893.7
  Bottom Layer w10: v1(2026.83,-2776.91) 2029.5,-2779.59 2029.5,-2785.79 2043.47,-2799.76 2053.31,-2799.76 C28.1@2066.93,-2813.39
+3V3: C19.1 C88.1 J1.A3 J1.A4 L6.1 L7.1 | length 8137.8
  Top Layer w10: v1(3697.78,-3425.21) 3697.37,-3424.8 3697.37,-3366.55 C19.1@3696.97,-3366.14 3696.97,-3323.23 3707.6,-3312.6 L6.1@3707.6,-3307.09
  Top Layer w25: v1(2681.1,-153.54) 2683,-155.44 C88.1@2741,-155.44 2846.35,-155.44 cw(c2846.35,-179) L7.1@2869.91,-179
  Layer 4 (sig) w20: v1(100.51,-1003.94) v1(100.51,-964.57)
  Layer 4 (sig) w25: v1(100.51,-964.57) 135.43,-964.57 160,-940 2141.73,-940 ; v1(2681.1,-153.54) 2685.04,-157.48 2685.04,-367.25 2670.39,-381.89 2283.46,-381.89 2141.73,-523.62 2141.73,-940 ; v1(3697.78,-3425.21) 3697.78,-3257.78 3630,-3190 3630,-1124.64 3615.36,-1110 3060,-1110 2890,-940 2141.73,-940
  Bottom Layer w20: J1.A4@-177.17,-925.2 61.14,-925.2 ; J1.A3@-177.17,-885.83 21.77,-885.83 61.14,-925.2 ; v1(100.51,-1003.94) v1(100.51,-964.57) 61.14,-925.2
+5V: J1.B3 J1.B4 J1.B5 J1.B6 PWR1.1 PWR1.2 PWR1.3
+VCCIOB: C23.1 C24.1 C27.1 C31.1 C33.1 C38.1 J1.B11 U1.AF11 U1.AG8 U1.AJ12 U1.AK9 U1.AM13 U1.AN10 | length 548
  Top Layer w12: U1.AM13@1968.5,-2204.72 v1(1988.19,-2185.04) ; U1.AJ12@2007.87,-2322.83 v1(2027.56,-2303.15) ; U1.AF11@2047.24,-2440.94 v1(2066.93,-2421.26) ; U1.AN10@2086.61,-2165.35 v1(2106.3,-2185.04) ; U1.AK9@2125.98,-2283.46 v1(2145.67,-2263.78) ; U1.AG8@2165.35,-2401.57 v1(2185.04,-2381.89)
  Bottom Layer w12: C38.1@1940.06,-2202.1 1948.83,-2193.34 1976.64,-2193.34 1984.94,-2185.04 v1(1988.19,-2185.04) ; C33.1@2006.3,-2342.52 2025.26,-2323.56 2025.26,-2305.45 v1(2027.56,-2303.15) ; C31.1@2017.84,-2421.26 v1(2066.93,-2421.26) ; C27.1@2068.68,-2154.23 2081.3,-2166.85 2085.84,-2166.85 2104.02,-2185.04 v1(2106.3,-2185.04) ; v1(2086.49,-1830.59) 2086.49,-1833.83 2096.39,-1843.73 2096.39,-1925.38 C23.1@2092.64,-1929.13 ; v1(2145.67,-2263.78) 2147.97,-2261.48 2147.97,-2253.29 2151.39,-2249.87 2151.39,-2226.55 2158.42,-2219.52 C24.1@2182.82,-2219.52
  other v2: 1551.77,-1562.77 1630.51,-1562.77 1689.57,-1562.77 1551.77,-1510.37 1630.51,-1510.37 1689.57,-1510.37 78.74,-1476.38 137.8,-1476.38 196.85,-1476.38 1551.77,-1451.31 1630.51,-1451.31 1689.57,-1451.31 78.74,-1419.64 137.8,-1419.64 196.85,-1419.64
/USB_CE: J1.A81 U1.D23 | length 2218.5
  Top Layer w5: v1(39.37,-4005.59) 44.51,-4005.59 54.99,-3995.11 60.01,-3995.11 125.12,-3930 1190.2,-3930 1576.89,-3543.31 v1(1576.89,-3503.94) ; v1(1555.12,-3326.77) U1.D23@1574.8,-3307.09
  Bottom Layer w5: J1.A81@-177.17,-4035.43 19.68,-4035.43 28.89,-4026.23 28.89,-4021.21 39.37,-4010.73 v1(39.37,-4005.59) ; v1(1555.12,-3326.77) 1557.21,-3326.77 1576.89,-3346.46 v1(1576.89,-3503.94)
/USB_RD: J1.A80 U1.C23 | length 2129.3
  Top Layer w5: v1(-70,-3980) -3.62,-3980 61.38,-3915 1191.06,-3915 1555.12,-3550.94 1555.12,-3503.94 1555.12,-3366.14 U1.C23@1574.8,-3346.46
  Bottom Layer w5: J1.A80@-177.17,-3996.06 -165.89,-3984.78 -79.93,-3984.78 -75.14,-3980 v1(-70,-3980)
AD0P: R16.2 U1.AE16 | length 1727.9
  Top Layer w8: v1(1830.71,-2460.63) U1.AE16@1850.39,-2480.32
  Top Layer w10: v1(3191.06,-2637.79) R16.2@3244.38,-2637.8
  Layer 4 (sig) w5: v1(1830.71,-2460.63) 1890.3,-2520.22 1901.02,-2520.22 1901.37,-2519.87 2387.62,-2519.87 2551.14,-2683.4 2551.14,-2740.36 2665.11,-2854.33 2974.53,-2854.33 v1(3191.06,-2637.79)
AD1P: R17.2 U1.AF15 | length 1712.6
  Top Layer w5: v1(1870.08,-2460.63) U1.AF15@1889.76,-2440.94
  Top Layer w10: v1(3191.06,-2559.06) R17.2@3244.38,-2559.06
  Layer 4 (sig) w5: v1(1870.08,-2460.63) 1889.76,-2480.32 2362.2,-2480.32 2561.14,-2679.25 2561.14,-2736.22 2669.25,-2844.33 2886.1,-2844.33 3171.38,-2559.06 v1(3191.06,-2559.06)
AD8P: R7.2 U1.AE18 | length 1092
  Top Layer w8: U1.AE18@1771.65,-2480.32 v1(1791.34,-2460.63)
  Top Layer w10: v1(2698.94,-2559.05) R7.2@2757.87,-2559.06
  Layer 4 (sig) w5: v1(1791.34,-2460.63) 1850.39,-2401.57 1938.73,-2401.57 1987.92,-2450.76 2127.96,-2450.76 2137.59,-2441.13 2336.91,-2441.13 2346.73,-2450.94 2590.83,-2450.94 v1(2698.94,-2559.05)
AD12P: R6.2 U1.AK15 | length 1245.1
  Top Layer w8: v1(1870.08,-2263.78) U1.AK15@1889.76,-2283.46
  Top Layer w10: v1(2698.94,-2618.11) R6.2@2757.87,-2618.11
  Layer 4 (sig) w5: v1(1870.08,-2263.78) 1870.08,-2318.78 1874.32,-2323.02 1878.16,-2323.02 1889.58,-2334.44 1889.58,-2338.28 1992.06,-2440.76 2103.56,-2440.76 2113.19,-2431.13 2341.06,-2431.13 2350.87,-2440.94 2639.88,-2440.94 ; 2668.27,-2469.34 2639.88,-2440.94 ; v1(2698.94,-2618.11) 2736.22,-2580.83 2736.22,-2537.28 2639.88,-2440.94
AMPVCC: C86.2 C87.2 L7.2 L8.2 | length 2189.6
  Top Layer w25: L7.2@2984.09,-179 3049.35,-179 ccw(c3049.35,-125.98) 3102.36,-125.98 cw(c3125.98,-125.98) 3125.98,-102.36 3736.22,-102.36 cw(c3736.22,-169.29) 3803.15,-169.29 3803.15,-236.22 cw(c3767.72,-236.22) 3767.72,-271.65 ccw(c3767.72,-295.28) 3744.09,-295.28 3744.09,-744.79 cw(c3740.44,-744.79) 3740.44,-748.44 ; C87.2@3702,-748.44 3740.44,-748.44 ; 4030.6,-1047.24 3932.68,-1047.24 cw(c3932.68,-953.15) 3866.14,-1019.69 cw(c3898.08,-987.75) 3852.91,-987.75 L8.2@3852.91,-700 cw(c3804.47,-700) 3804.47,-748.44 3740.44,-748.44
CFG_CLK: J1.A57 R3.2 | length 787.4
  Top Layer w5: v1(413.39,-3090.55) R3.2@610.24,-3090.55
  Bottom Layer w5: J1.A57@-177.17,-3090.55 v1(413.39,-3090.55)
CFG_D0: J1.A59 U1.AC7 | length 2709.9
  Top Layer w5: U1.AC7@2204.72,-2559.06 v1(2224.41,-2539.37)
  Layer 3 (sig) w5: v1(78.74,-3169.29) 214.39,-3169.29 640.89,-2742.79 705.28,-2742.79 726.8,-2721.27 1046.46,-2721.27 1090.38,-2677.35 1862,-2677.35 1940.74,-2598.61 1959.58,-2598.61 1999.32,-2558.87 2153.75,-2558.87 2163.38,-2549.24 2165.17,-2547.45 2165.17,-2531.66 2176.96,-2519.87 2207,-2519.87 2224.41,-2537.28 v1(2224.41,-2539.37)
  Bottom Layer w5: J1.A59@-177.17,-3169.29 -166.8,-3169.29 J1.A59@-155.52,-3180.57 ; J1.A59@-143.81,-3169.29 v1(78.74,-3169.29)
CFG_D1: J1.B61 U1.AB7 | length 2760.7
  Top Layer w5: J1.B61@-177.17,-3248.03 157.48,-3248.03 165.45,-3240.06 165.45,-3236.52 177.17,-3224.81 v1(177.17,-3220.66) ; U1.AB7@2204.72,-2598.43 v1(2224.41,-2578.74)
  Layer 3 (sig) w5: v1(177.17,-3220.66) 241.56,-3220.66 730.95,-2731.27 1050.61,-2731.27 1085.16,-2696.72 1333.85,-2696.72 1353.48,-2716.35 1454.53,-2716.35 1464.16,-2706.72 1685.45,-2706.72 1695.08,-2716.35 1724.82,-2716.35 1734.45,-2706.72 1773.63,-2706.72 1783.26,-2716.35 1857.41,-2716.35 1936.15,-2637.61 1996.27,-2637.61 2005.9,-2627.98 2068.85,-2627.98 2098.59,-2598.24 2123.82,-2598.24 2153.19,-2568.87 2157.89,-2568.87 2167.52,-2559.24 2207,-2559.24 2224.41,-2576.65 v1(2224.41,-2578.74)
CFG_D2: J1.A60 U1.AA7 | length 2791.5
  Top Layer w5: U1.AA7@2204.72,-2637.8 v1(2224.41,-2618.11)
  Layer 3 (sig) w5: v1(-40,-3190) -39.16,-3189.16 76.99,-3189.16 127.99,-3240.16 236.2,-3240.16 729.31,-2747.05 1048.97,-2747.05 1089.3,-2706.72 1329.7,-2706.72 1349.33,-2726.35 1458.67,-2726.35 1468.3,-2716.72 1681.31,-2716.72 1690.94,-2726.35 1728.96,-2726.35 1738.59,-2716.72 1769.49,-2716.72 1779.12,-2726.35 1861.55,-2726.35 1930.55,-2657.35 1990.67,-2657.35 2010.04,-2637.98 2114.01,-2637.98 2125.8,-2626.19 2125.8,-2610.4 2137.59,-2598.61 2207,-2598.61 2224.41,-2616.02 v1(2224.41,-2618.11)
  Bottom Layer w5: J1.A60@-187.2,-3198.62 J1.A60@-177.17,-3208.66 -58.66,-3208.66 v1(-40,-3190) -38.79,-3188.79 v1@-38.42,-3189.16
CFG_D3: J1.B62 U1.Y7 | length 2750
  Top Layer w5: J1.B62@-177.17,-3287.4 -19.69,-3287.4 -0.32,-3268.03 235.91,-3268.03 v1(236.22,-3267.72) ; U1.Y7@2204.72,-2677.17 v1(2224.41,-2657.48)
  Layer 3 (sig) w5: v1(236.22,-3267.72) 517.93,-3267.72 1000.18,-2785.46 1173.64,-2785.46 1183.27,-2795.09 1215.25,-2795.09 1215.51,-2794.83 1264.8,-2794.83 1265.06,-2795.09 1293.99,-2795.09 1333.62,-2755.46 1405.98,-2755.46 1416.24,-2765.72 1488.6,-2765.72 1488.86,-2765.46 1621.38,-2765.46 1621.64,-2765.72 1812.03,-2765.72 1822.29,-2755.46 1860.73,-2755.46 1938.84,-2677.35 1980.48,-2677.35 2019.48,-2716.35 2114.38,-2716.35 2125.98,-2704.74 2125.98,-2688.96 2137.96,-2676.98 2207,-2676.98 2224.41,-2659.57 v1(2224.41,-2657.48)
CFG_D4: J1.A61 U1.M20 | length 2234.7
  Top Layer w5: v1(0,-3208.66) 91.44,-3208.66 98.94,-3201.16 661.79,-3201.16 v1(809.06,-3348.43) ; v1(1673.23,-3011.81) U1.M20@1692.91,-2992.13
  Layer 3 (sig) w5: v1(809.06,-3348.43) 909.47,-3248.03 1173.58,-3248.03 1193.08,-3267.53 1569.2,-3267.53 1613.99,-3222.75 1613.99,-3197.05 1635.29,-3175.75 1635.29,-3140.28 1665.15,-3110.42 1680.94,-3110.42 1693.1,-3098.26 1693.1,-3031.68 v1(1673.23,-3011.81)
  Bottom Layer w5: J1.A61@-177.17,-3248.03 -29.39,-3248.03 -16.42,-3235.06 -16.42,-3225.08 v1(0,-3208.66)
CFG_D5: J1.B63 U1.L20 | length 2036.3
  Top Layer w5: J1.B63@-177.17,-3326.77 35.36,-3326.77 45.36,-3316.77 501.79,-3316.77 539.19,-3354.17 v1(734.03,-3354.17) ; v1(1673.23,-3051.18) U1.L20@1692.91,-3031.5
  Layer 3 (sig) w5: v1(734.03,-3354.17) 899.41,-3188.79 1071.07,-3188.79 1080.83,-3179.03 1199.78,-3179.03 1263.06,-3115.75 1395.32,-3115.75 1401.02,-3110.05 1460.03,-3110.05 1602.16,-3110.05 1610.78,-3101.44 1610.78,-3079.3 1619.39,-3070.68 1653.73,-3070.68 v1(1673.23,-3051.18)
CFG_D6: J1.A62 U1.R21 | length 2127.6
  Top Layer w5: v1(-39.37,-3267.72) -14.14,-3267.72 -4.46,-3258.03 170.11,-3258.03 179.92,-3248.22 320.69,-3248.22 369.24,-3296.77 638.7,-3296.77 v1(653.35,-3282.12) ; v1(1633.86,-2893.7) U1.R21@1653.54,-2874.02
  Layer 3 (sig) w5: v1(653.35,-3282.12) 653.35,-3276.98 662.71,-3267.62 662.71,-3260.37 680.73,-3242.34 713.05,-3242.34 838.77,-3116.62 849.71,-3116.62 1023.44,-2942.89 1114.58,-2942.89 1124.53,-2932.94 1238.81,-2932.94 1240.23,-2934.36 1318.06,-2934.36 1319.6,-2932.81 1360.8,-2932.81 1370.41,-2923.2 1409.86,-2923.2 1419.49,-2913.57 1445.09,-2913.57 1456.69,-2925.18 1456.69,-2940.96 1468.3,-2952.57 1484.46,-2952.57 1495.99,-2941.04 1495.99,-2923.89 1506.56,-2913.31 1563.09,-2913.31 1574.75,-2901.65 1574.75,-2885.86 1586.41,-2874.2 1614.36,-2874.2 v1(1633.86,-2893.7)
  Bottom Layer w5: J1.A62@-177.17,-3287.4 -59.06,-3287.4 v1(-39.37,-3267.72)
CFG_D7: J1.B64 U1.R22 | length 2056.8
  Top Layer w5: J1.B64@-177.17,-3366.14 68.9,-3366.14 88.77,-3346.27 v1(318.34,-3346.27) ; v1(1594.49,-2854.33) U1.R22@1614.17,-2874.02
  Layer 3 (sig) w5: v1(318.34,-3346.27) 320.28,-3348.21 337.84,-3348.21 340.34,-3350.71 477.36,-3350.71 751.4,-3076.67 822.16,-3076.67 822.21,-3076.62 828.96,-3076.62 1002.7,-2902.89 1057,-2902.89 1086,-2873.89 1248.18,-2873.89 1248.23,-2873.83 1257.68,-2873.83 1267.31,-2864.2 1300.61,-2864.2 1310.24,-2873.83 1326.97,-2873.83 1338.58,-2862.22 1338.58,-2846.44 1350.56,-2834.46 1401.02,-2834.46 1410.65,-2824.83 1487.07,-2824.83 1516.57,-2854.33 v1(1594.49,-2854.33)
CFG_D8_A0: J1.A63 U1.P20 | length 2083.4
  Top Layer w5: v1(118.11,-3287.53) 137.35,-3306.77 688.66,-3306.77 v1(700.4,-3318.51) ; v1(1673.23,-2933.07) U1.P20@1692.91,-2913.39
  Layer 3 (sig) w5: v1(700.4,-3318.51) 862.28,-3156.62 971.66,-3156.62 1096.65,-3031.63 1144.69,-3031.63 1154.63,-3021.68 1258.76,-3021.68 1278.39,-3041.31 1398.84,-3041.31 1418.42,-3021.73 1449.23,-3021.73 1449.44,-3021.94 1517.41,-3021.94 1557.07,-2982.28 1582.87,-2982.28 1591.43,-2973.73 1605.57,-2973.73 1626.54,-2952.76 1653.54,-2952.76 v1(1673.23,-2933.07)
  Bottom Layer w5: J1.A63@-177.17,-3326.77 78.87,-3326.77 v1(118.11,-3287.53)
CFG_D9_A1: J1.B65 U1.P21 | length 2143.1
  Top Layer w5: J1.B65@-177.17,-3405.51 -173.41,-3409.26 200.6,-3409.26 v1(299.21,-3507.87) ; v1(1633.86,-2933.07) U1.P21@1653.54,-2913.39
  Layer 3 (sig) w5: v1(299.21,-3507.87) 483.45,-3507.87 718.98,-3272.34 725.48,-3272.34 851.2,-3146.62 903.14,-3146.62 925.38,-3124.39 925.38,-3111.84 1015.6,-3021.63 1140.55,-3021.63 1150.49,-3011.68 1262.91,-3011.68 1282.54,-3031.31 1393.57,-3031.31 1413.16,-3011.73 1453.37,-3011.73 1453.58,-3011.94 1506.88,-3011.94 1546.54,-2972.28 1578.73,-2972.28 1587.29,-2963.73 1601.43,-2963.73 1632.09,-2933.07 v1(1633.86,-2933.07)
CFG_D10_A2: J1.A64 U1.N22 | length 2099.5
  Top Layer w5: v1(30,-3346.27) 49.5,-3326.77 497.65,-3326.77 578.93,-3408.05 632.46,-3408.05 v1(636.1,-3411.69) ; U1.N22@1614.17,-2952.76 1614.17,-2953.05 1633.86,-2972.73 v1(1633.86,-2973.02)
  Layer 3 (sig) w5: v1(636.1,-3411.69) 636.1,-3410.39 879.86,-3166.62 975.8,-3166.62 1100.8,-3041.63 1148.83,-3041.63 1158.78,-3031.68 1254.62,-3031.68 1274.25,-3051.31 1402.98,-3051.31 1422.56,-3031.73 1445.09,-3031.73 1445.3,-3031.94 1562.57,-3031.94 1574.78,-3019.73 1574.78,-3004.52 1581.85,-2997.45 1586.41,-2992.89 1615.31,-2992.89 1633.86,-2974.34 v1(1633.86,-2973.02)
  Bottom Layer w5: J1.A64@-177.17,-3366.14 10.13,-3366.14 v1(30,-3346.27)
CFG_D11_A3: J1.B66 U1.M22 | length 2058.2
  Top Layer w5: J1.B66@-177.17,-3444.88 181.1,-3444.88 v1(255.91,-3519.69) ; v1(1594.49,-3012.39) 1594.49,-3012.1 1614.17,-2992.41 U1.M22@1614.17,-2992.13
  Layer 3 (sig) w5: v1(255.91,-3519.69) 261.05,-3519.69 268.74,-3527.37 547.99,-3527.37 714.53,-3360.83 714.53,-3346.09 884,-3176.62 1024.18,-3176.62 1129.94,-3070.87 1467.91,-3070.87 1467.99,-3070.94 1484.14,-3070.94 1484.22,-3070.87 1539.35,-3070.87 1594.49,-3015.73 v1(1594.49,-3012.39)
CFG_D12_A4: J1.A65 U1.R23 | length 2096.3
  Top Layer w5: v1(1555.12,-2893.7) U1.R23@1574.8,-2874.02
  Layer 3 (sig) w5: v1(381.89,-3397.64) 496.08,-3397.64 616.15,-3277.56 616.15,-3240.2 759.68,-3096.67 830.44,-3096.67 830.49,-3096.62 837.24,-3096.62 1010.98,-2922.89 1065.29,-2922.89 1094.29,-2893.89 1228.04,-2893.89 1248.51,-2914.36 1309.77,-2914.36 1311.32,-2912.81 1350.95,-2912.81 1389.56,-2874.2 1445.09,-2874.2 1456.69,-2885.81 1456.69,-2901.59 1468.3,-2913.2 1485.65,-2913.2 1495.88,-2902.97 1495.88,-2883.7 1505.38,-2874.2 1535.62,-2874.2 v1(1555.12,-2893.7)
  Bottom Layer w5: J1.A65@-177.17,-3405.51 -30.58,-3405.51 -10.9,-3425.2 210.97,-3425.2 238.53,-3397.64 v1(381.89,-3397.64)
CFG_D13_A5: J1.B67 U1.P23 | length 2041.8